# Altium PCB PCB1.PcbDoc
Units mil, origin at the board's own origin, x right, y up, seen from the top; angles counter-clockwise.
Board outline 1970 x 1215 mil, 4 copper layers (Top Layer, Layer 1, Layer 2, Bottom Layer), stack 23.756 mil thick; 61 components, 50 nets, 219 pads, 82 vias.
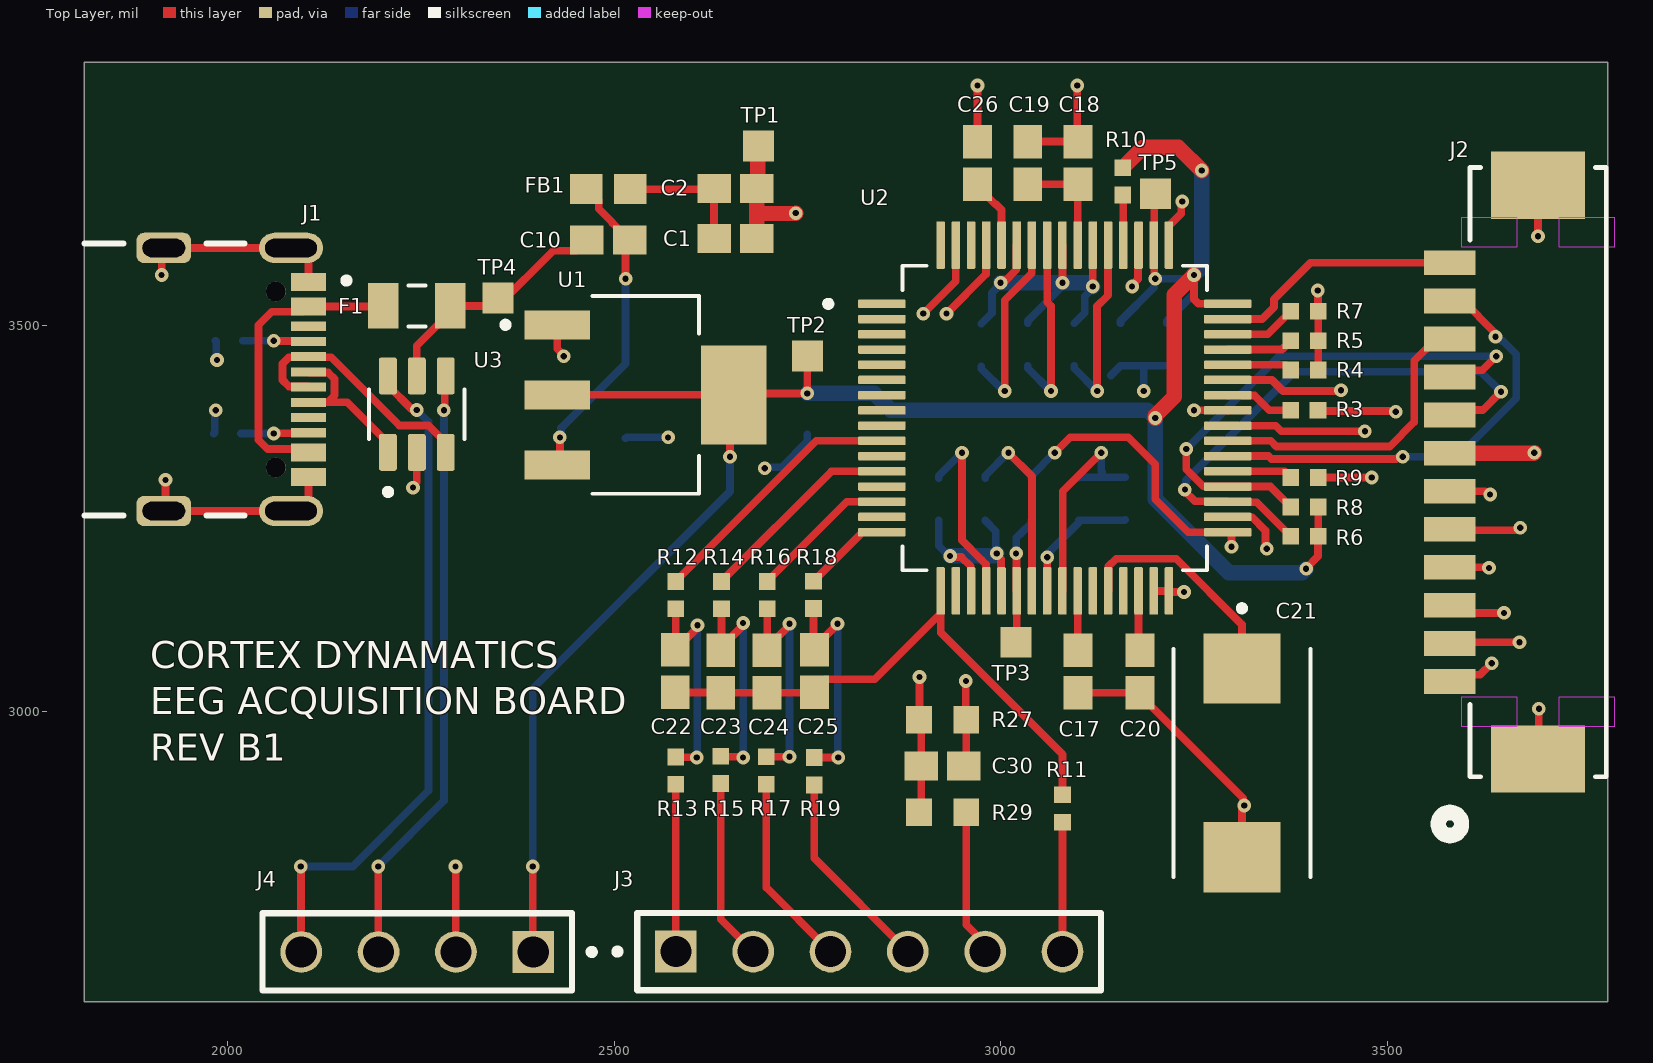
[diagram p0: Top Layer view]
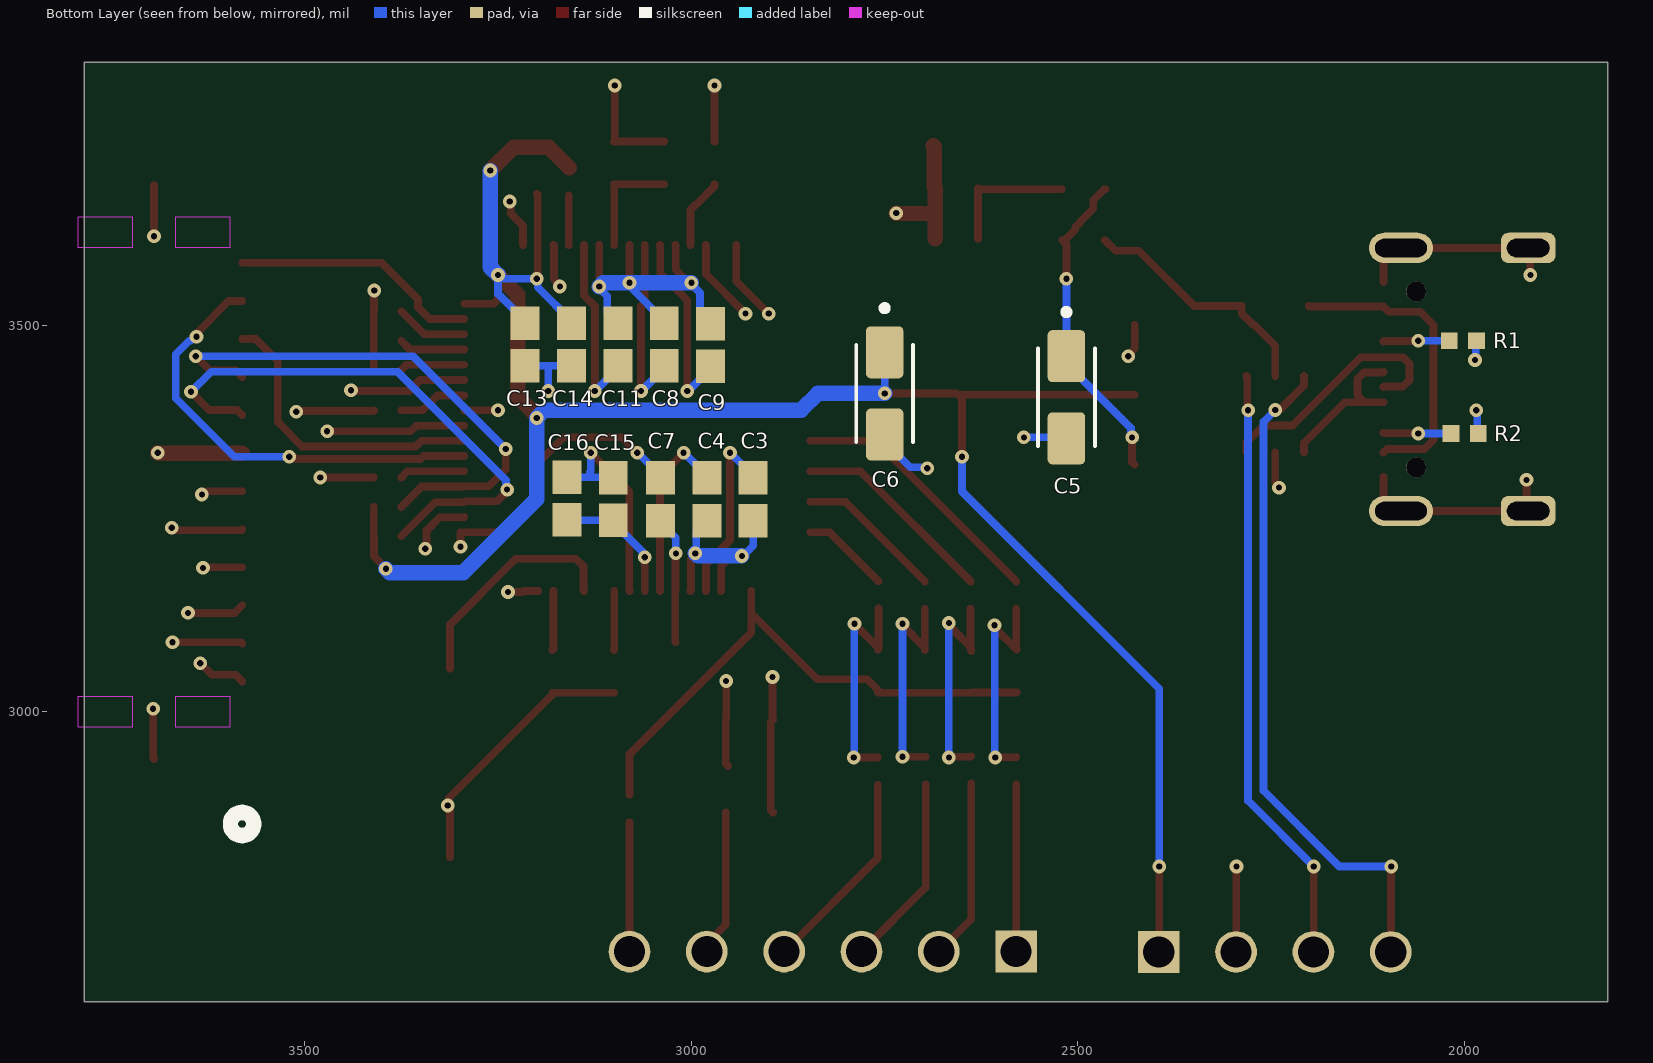
[diagram p1: Bottom Layer view, seen from below]
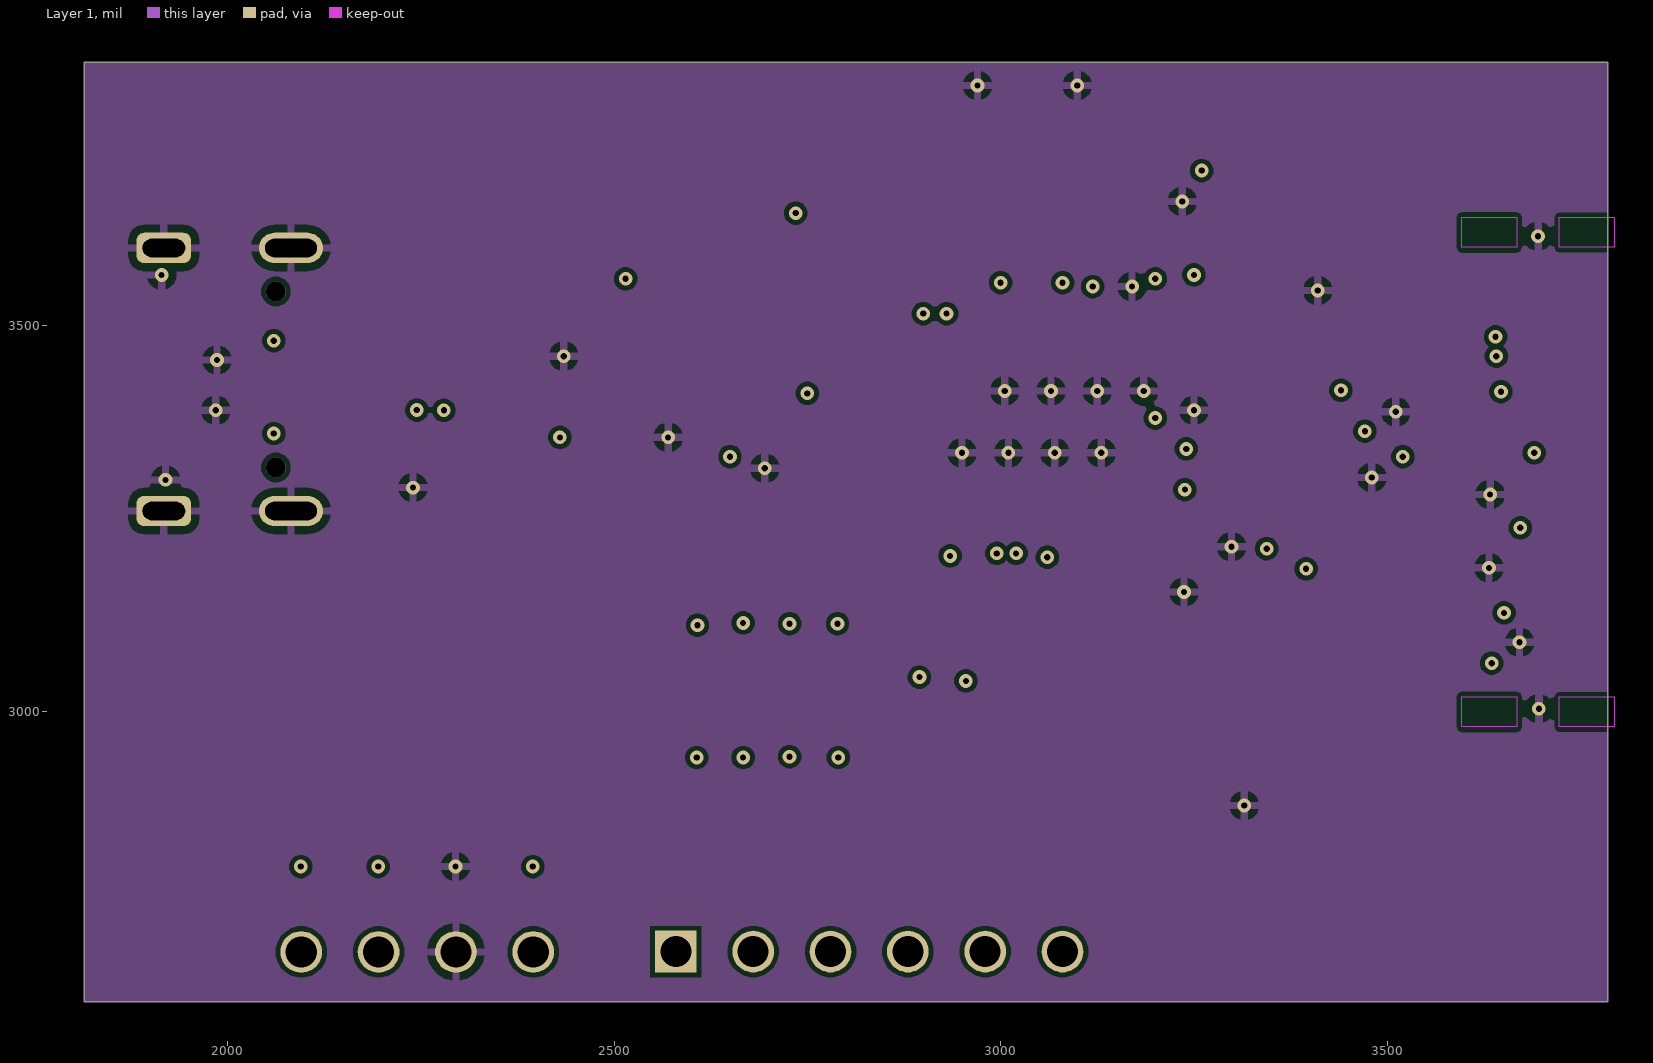
[diagram p2: Layer 1]
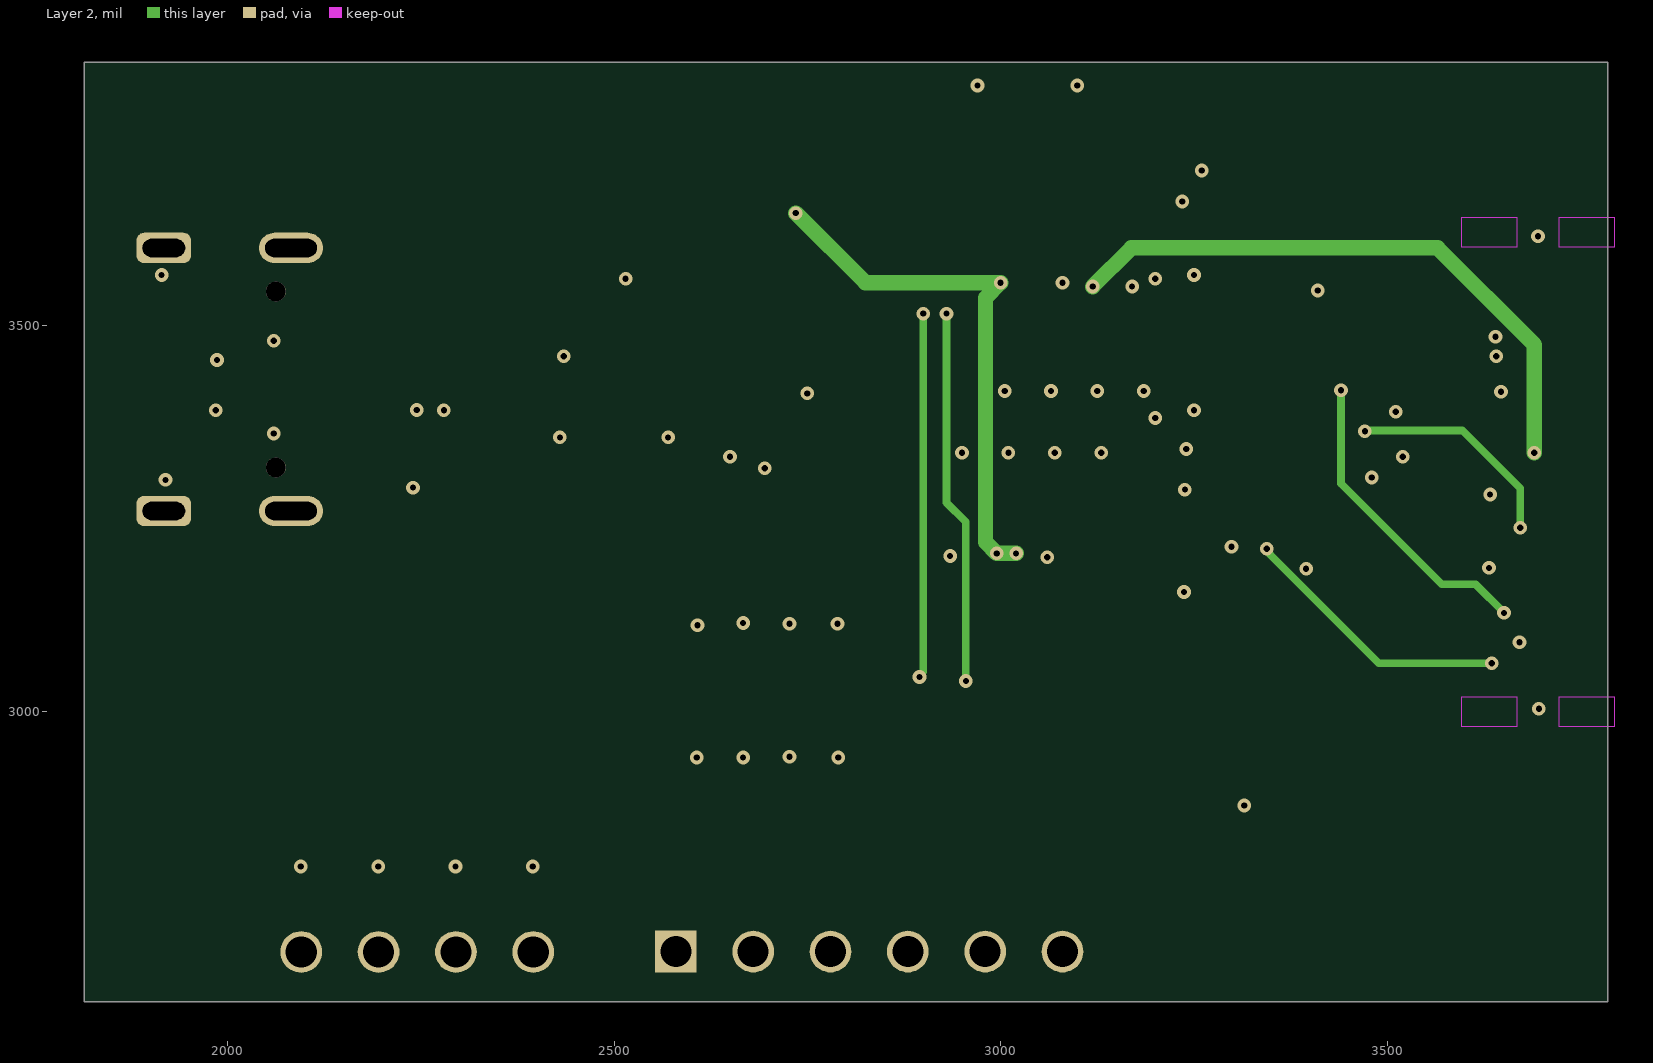
[diagram p3: Layer 2]
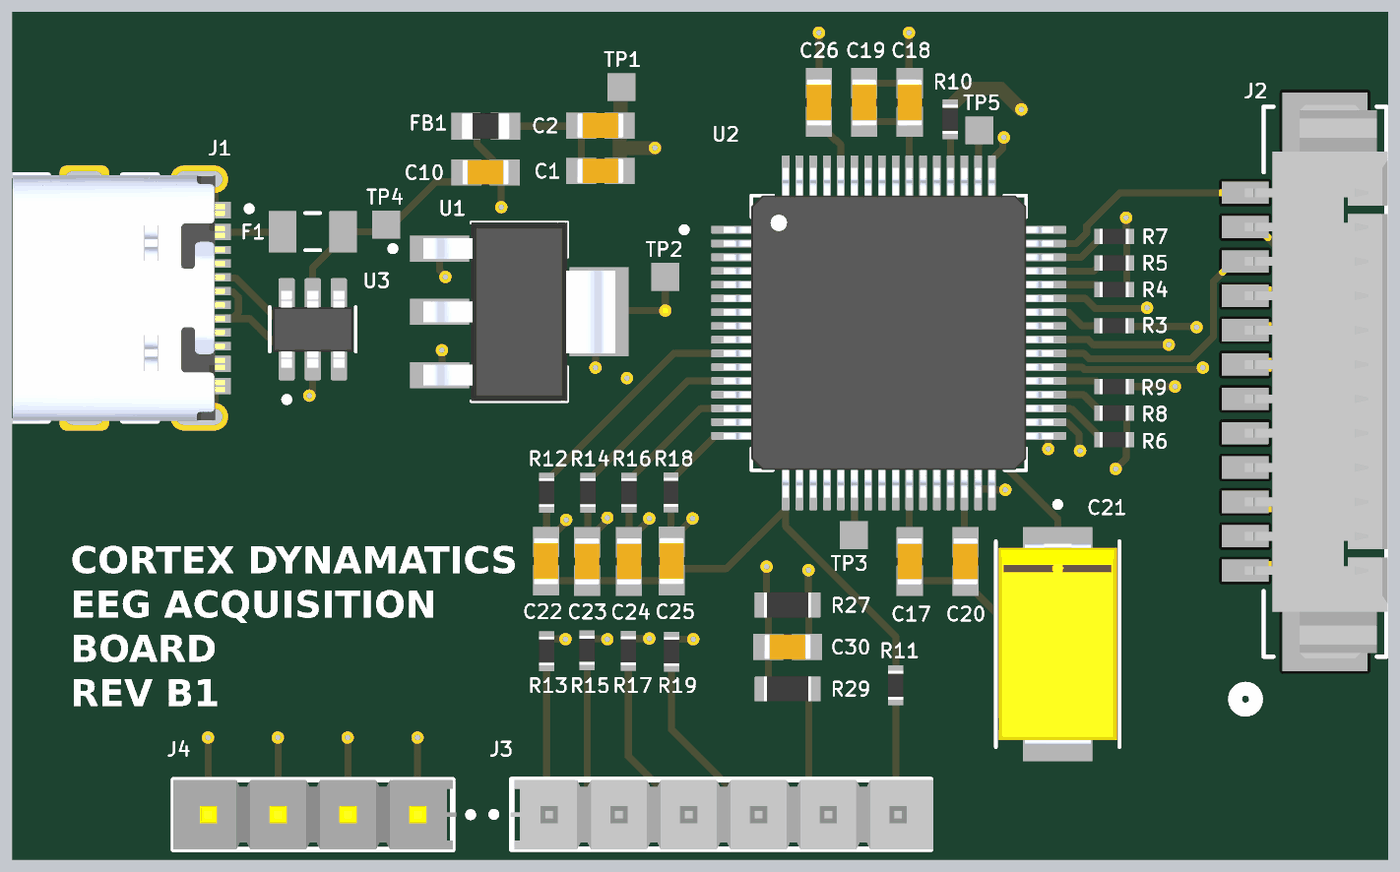
[diagram p4: 3D render of the assembled board from above, using the file's embedded part models]
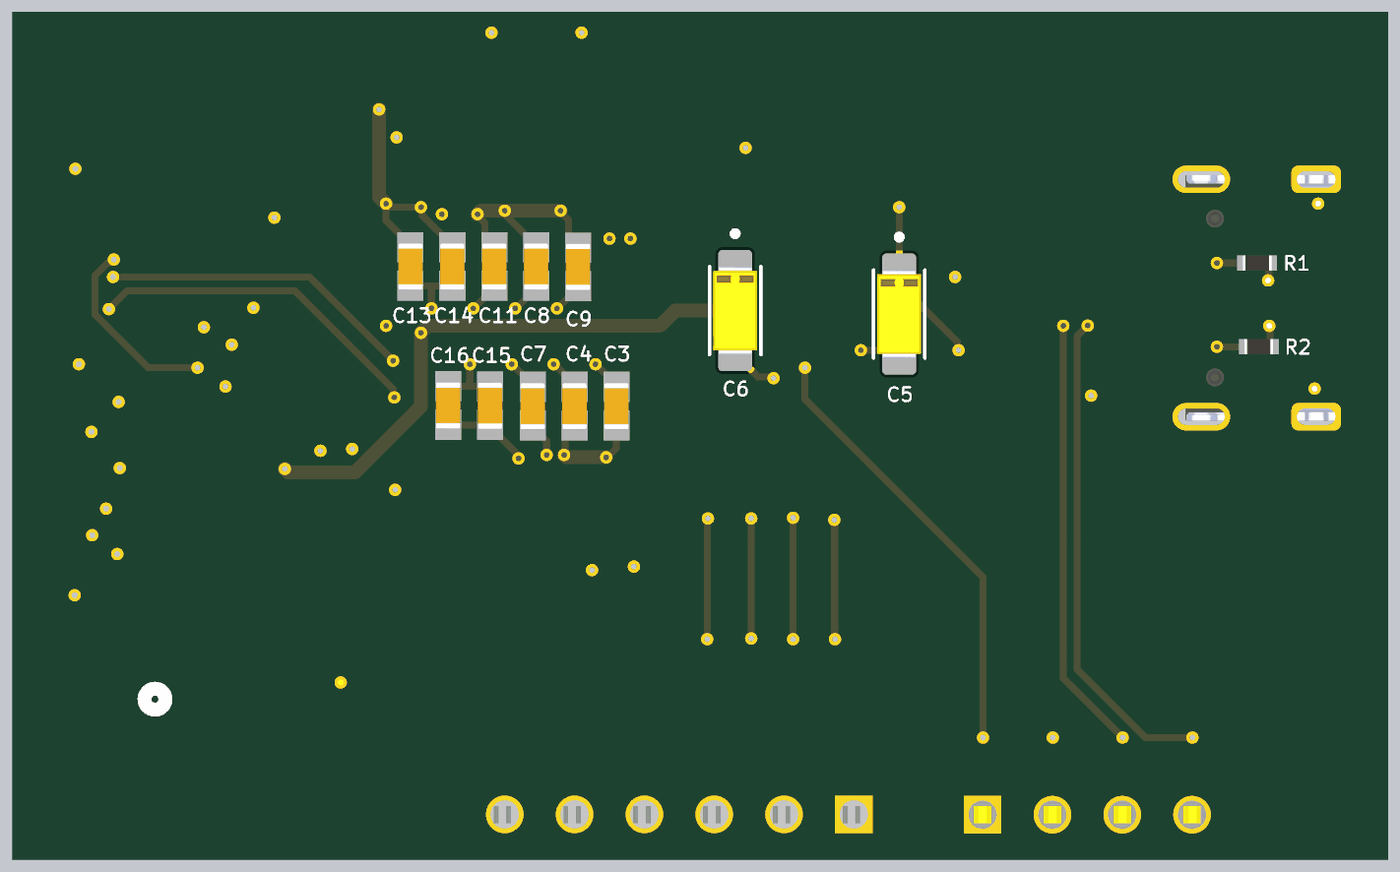
[diagram p5: 3D render of the assembled board from below, using the file's embedded part models]

## Layer stack, top to bottom
Top Solder: solder mask 0.4, Solder Resist, Dk 3.5
Top Layer: signal copper 1.4
Dielectric 2: prepreg 2.8, PP-006, Dk 4.1
Layer 1: signal copper 1.378
Dielectric 1: dielectric 12.6, FR-4, Dk 4.8
Layer 2: signal copper 1.378
Dielectric 3: prepreg 2.8, PP-006, Dk 4.1
Bottom Layer: signal copper 1.4
Bottom Solder: solder mask 0.4, Solder Resist, Dk 3.5

## Board outline
1815,2625 1815,3840 3785,3840 3785,2625

## Design rules (kind name [scope] priority, off if disabled: settings)
Clearance [All] p1: gap=6 ignorepadtopadclearanceinfootprint=FALSE
HoleSize [All] p1: absolutevalues=TRUE maxlimit=248.03 minlimit=8 maxpercent=80.000 minpercent=20.000
MinimumSolderMaskSliver [All] p1: minsoldermaskwidth=4
PlaneClearance [All] p1: clearance=10
PolygonConnect [All] p1: connectstyle=Relief reliefconductorwidth=10 reliefentries=4 polygonreliefangle="90 Angle" airgapwidth=10
RoutingVias [All] p1: holewidth=8 width=17.72 viastyle="Through Hole" minholewidth=8 minwidth=17.72 maxholewidth=28 maxwidth=50
SilkToSilkClearance [All] p1: silktosilkclearance=6
SilkToSolderMaskClearance [IsPad] p1: minsilkscreentomaskgap=6 clearancetoexposedcopper=TRUE
SolderMaskExpansion [All] p1: expansion=0 istentingtop=FALSE
SupplyNets "Schematic Supply Nets_2" [InNet('3V3')] p1: voltage=0.000
SupplyNets "Schematic Supply Nets_1" [InNet('GND')] p2: voltage=0.000
SupplyNets "Schematic Supply Nets" [InNet('5V')] p3: voltage=0.000
UnRoutedNet [All] p1: checkbadconnections=TRUE
Width [All] p1: maxlimit=20 minlimit=6 preferedwidth=10
24 further rules are at their usual default settings.

## Components (designator, comment, footprint, x,y, rotation, side; value= is the part's Value field where it differs from the comment)
C1 "10uF" CAP_0603 2657,3612 r0 top value="10 uF"
C2 "100nF" CAP_0603 2657,3677 r0 top value="100 nF"
C3 "1uF" CAP_0603 2920,3275 r270 bottom value="1 uF"
C4 "1uF" CAP_0603 2980,3275 r270 bottom value="1 uF"
C5 "10uF_T" CAP_TANTALUM_1206 2515,3406.85 r270 bottom value="10 uF"
C6 "10uF_T" CAP_TANTALUM_1206 2750,3411.85 r270 bottom value="10 uF"
C7 "1uF" CAP_0603 3040,3275 r270 bottom value="1 uF"
C8 "1uF" CAP_0603 3035,3475 r90 bottom value="1 uF"
C9 "1uF" CAP_0603 2975,3474.44 r90 bottom value="1 uF"
C10 "10uF" CAP_0603 2492.56,3610 r0 top value="10 uF"
C11 "1uF" CAP_0603 3095,3475 r90 bottom value="1 uF"
C13 "1uF" CAP_0603 3215,3475 r90 bottom value="1 uF"
C14 "1uF" CAP_0603 3155,3475 r90 bottom value="1 uF"
C15 "100nF" CAP_0603 3101,3275.44 r90 bottom value="100 nF"
C16 "10uF" CAP_0603 3161,3276 r90 bottom value="10 uF"
C17 "1uF" CAP_0603 3100,3052.44 r90 top value="1 uF"
C18 "1uF" CAP_0603 3100,3710 r270 top value="1 uF"
C19 "100nF" CAP_0603 3035,3710 r270 top value="100 nF"
C20 "1uF" CAP_0603 3180,3052.44 r90 top value="1 uF"
C21 "100uF_T" CAP_TANTALUM_2917 3312,2938.95 r270 top value="100 uF"
C22 "4.7nF" CAP_0603 2579.19,3052.67 r270 top value="4.7 nF"
C23 "4.7nF" CAP_0603 2638,3052.44 r270 top value="4.7 nF"
C24 "4.7nF" CAP_0603 2698,3052.44 r270 top value="4.7 nF"
C25 "4.7nF" CAP_0603 2759,3053 r270 top value="4.7 nF"
C26 "100nF" CAP_0603 2970,3710 r90 top value="100 nF"
C30 "1.5nF" CAP_0603 2925,2930 r0 top value="1.5 nF"
F1 "MF-PSML110/6-2" MF-PSML110/6-2 2245,3525 r0 top
FB1 "BLM18KG601BH1D" FB_0603 2492.65,3676 r0 top value="600 Ohm"
J1 "USBC_Horizontal" USBC_Horizontal 1962.8,3429.84 r270 top
J2 "53261-1271" 53261-1271 3695,3315 r270 top
J3 "TSW-106-14-L-S" TSW-106-14-L-S 2831,2689.55 r0 top
J4 "TSW-104-14-F-S" TSW-104-14-F-S 2245.56,2689.55 r180 top
R1 "5.1K" RES_0402 2002.28,3480 r180 bottom value="5.1 kOhm"
R2 "5.1K" RES_0402 2000,3360 r180 bottom value="5.1 kOhm"
R3 "10K" RES_0402 3392.72,3390 r0 top value="10 kOhm"
R4 "10K" RES_0402 3393,3442 r0 top value="10 kOhm"
R5 "10K" RES_0402 3393,3480 r0 top value="10 kOhm"
R6 "10K" RES_0402 3393,3227 r180 top value="10 kOhm"
R7 "10K" RES_0402 3393,3518 r0 top value="10 kOhm"
R8 "10K" RES_0402 3393,3265 r180 top value="10 kOhm"
R9 "10K" RES_0402 3393,3303 r180 top value="10 kOhm"
R10 "10K" RES_0402 3158,3686 r270 top value="10 kOhm"
R11 "953R" RES_0402 3080,2875 r270 top value="953 Ohm"
R12 "5.1K" RES_0402 2580,3151 r270 top value="5.1 kOhm"
R13 "953R" RES_0402 2580,2924 r270 top value="953 Ohm"
R14 "5.1K" RES_0402 2639,3151 r270 top value="5.1 kOhm"
R15 "953R" RES_0402 2638,2925 r270 top value="953 Ohm"
R16 "5.1K" RES_0402 2698,3151 r270 top value="5.1 kOhm"
R17 "953R" RES_0402 2697,2924.28 r270 top value="953 Ohm"
R18 "5.1K" RES_0402 2758,3151.28 r270 top value="5.1 kOhm"
R19 "953R" RES_0402 2759,2923.28 r270 top value="953 Ohm"
R27 "1M" RES_0603 2925,2990 r0 top value="1 MOhm"
R29 "100K" RES_0603 2925,2870 r0 top value="100 kOhm"
TP1 "" TestPoint_0.4mm_SMD 2687,3732 r90 top
TP2 "" TestPoint_0.4mm_SMD 2750,3460 r90 top
TP3 "" TestPoint_0.4mm_SMD 3020,3090 r90 top
TP4 "" TestPoint_0.4mm_SMD 2350,3535 r90 top
TP5 "" TestPoint_0.4mm_SMD 3200,3670 r90 top
U1 "LM1117MPX-3.3/NOPB" LM1117MPX-3.3/NOPB 2540.22,3413.82 r0 top
U2 "ADS1299-4PAGR" ADS1299-4PAGR 3065,3380 r0 top
U3 "USBLC6-2SC6" USBLC6-2SC6 2245,3385 r90 top

## Footprints (in the part's own frame and the unit in brackets; to place one, negate y for a bottom-side part, rotate by r counter-clockwise, add the part's x,y. Pads: shape width x height; smd on the part's side, far side on the other; paste and mask are expansions set on the pad)
53261-1271 [mil]
  rect 32x67 smd paste+0 mask+4.02: 1(275.67,-114.35) 2(226.46,-114.35) 3(177.24,-114.35) 4(128.03,-114.35) 5(78.82,-114.35) 6(29.61,-114.35) 7(-19.61,-114.35) 8(-68.82,-114.35) 9(-118.03,-114.35) 10(-167.24,-114.35) 11(-216.46,-114.35) 12(-265.67,-114.35)
  rect 87x122 smd paste+0 mask+4.02: MP1(-366.06,-0.18) MP2(376.06,-0.18)
  Keep-Out Layer region: -285.54,27.32 -324.54,27.31 -324.54,98.31 -285.54,98.31
  Keep-Out Layer region: 334.54,27.32 295.54,27.32 295.54,98.32 334.54,98.32
  Keep-Out Layer region: -285.54,-98.67 -324.54,-98.67 -324.54,-27.67 -285.54,-27.67
  Keep-Out Layer region: 334.54,-98.67 295.54,-98.67 295.54,-27.67 334.54,-27.67
  silkscreen extent -389,-129 475,88, body extent -392,-115 402,90, height 133
ADS1299-4PAGR [mm]
  rrect25% 1.56x0.28 smd: 1(-5.553,3.75) 2(-5.553,3.25) 3(-5.553,2.75) 4(-5.553,2.25) 5(-5.553,1.75) 6(-5.553,1.25) 7(-5.553,0.75) 8(-5.553,0.25) 9(-5.553,-0.25) 10(-5.553,-0.75) 11(-5.553,-1.25) 12(-5.553,-1.75) 13(-5.553,-2.25) 14(-5.553,-2.75) 15(-5.553,-3.25) 16(-5.553,-3.75) 33(5.807,-3.75) 34(5.807,-3.25) 35(5.807,-2.75) 36(5.807,-2.25) 37(5.807,-1.75) 38(5.807,-1.25) 39(5.807,-0.75) 40(5.807,-0.25) 41(5.807,0.25) 42(5.807,0.75) 43(5.807,1.25) 44(5.807,1.75) 45(5.807,2.25) 46(5.807,2.75) 47(5.807,3.25) 48(5.807,3.75)
  rrect25% 0.28x1.56 smd: 17(-3.623,-5.68) 18(-3.123,-5.68) 19(-2.623,-5.68) 20(-2.123,-5.68) 21(-1.623,-5.68) 22(-1.123,-5.68) 23(-0.623,-5.68) 24(-0.123,-5.68) 25(0.377,-5.68) 26(0.877,-5.68) 27(1.377,-5.68) 28(1.877,-5.68) 29(2.377,-5.68) 30(2.877,-5.68) 31(3.377,-5.68) 32(3.877,-5.68) 49(3.877,5.68) 50(3.377,5.68) 51(2.877,5.68) 52(2.377,5.68) 53(1.877,5.68) 54(1.377,5.68) 55(0.877,5.68) 56(0.377,5.68) 57(-0.123,5.68) 58(-0.623,5.68) 59(-1.123,5.68) 60(-1.623,5.68) 61(-2.123,5.68) 62(-2.623,5.68) 63(-3.123,5.68) 64(-3.623,5.68)
  silkscreen extent -7.41,-5 5.13,5, body extent -5.87,-6 6.13,6, height 1.2
CAP_0603 [mm]
  rect 1.1x0.95 smd: 1(-0.7,0) 2(0.7,0)
  body extent -0.85,-0.45 0.85,0.45, height 0.9
CAP_TANTALUM_1206 [mm]
  rrect25% 1.71x1.23 smd paste+0 mask+0.102: 1(-1.35,0) 2(1.35,0)
  silkscreen extent -2.9,-0.93 1.6,0.93, body extent -1.6,-0.8 1.6,0.8, height 1.8
CAP_TANTALUM_2917 [mm]
  rect 2.31x2.52 smd: 1(-2.973,0) 2(3.227,0)
  silkscreen extent -5.05,-2.25 3.88,2.25, body extent -3.52,-2.15 3.78,2.15, height 3.1
FB_0603 [mm]
  rect 1.07x0.98 smd: 1(-0.72,0) 2(0.72,0)
  body extent -0.87,-0.48 0.87,0.48, height 0.95
LM1117MPX-3.3/NOPB [mm]
  rect 2.15x0.95 smd: 1(-2.885,2.203) 2(-2.885,-0.097) 3(-2.885,-2.397)
  rect 2.15x3.25 smd: 4(2.915,-0.097)
  silkscreen extent -4.68,-3.35 1.77,3.15, body extent -3.48,-3.35 3.51,3.15, height 1.8
MF-PSML110/6-2 [mm]
  rect 1x1.5 smd: 1(-1.1,0) 2(1.1,0)
  silkscreen extent -0.28,-0.67 0.28,0.67
RES_0402 [mm]
  rect 0.55x0.55 smd: 1(-0.45,0) 2(0.45,0)
  body extent -0.53,-0.28 0.53,0.28, height 0.4
RES_0603 [mm] "Chip Resistor, 2-Leads, Body 1.60x0.80mm, IPC Medium Density"
  rect 0.85x0.9 smd: 1(-0.775,0) 2(0.775,0)
  body extent -0.85,-0.45 0.85,0.45, height 0.55
TestPoint_0.4mm_SMD [mil]
  rect 40x40 smd: 1(0,0)
TSW-104-14-F-S [mm]
  rect 1.37x1.37 / inner round 1.37 / far side rect 1.37x1.37 hole 1.02: 1(-3.81,0)
  round 1.37 hole 1.02: 2(-1.27,0) 3(1.27,0) 4(3.81,0)
  silkscreen extent -5.83,-1.27 5.08,1.27, body extent -5.21,-1.27 5.08,1.27, height 10.67
TSW-106-14-L-S [mm]
  rect 1.37x1.37 hole 1.02: 1(-6.376,0.011)
  round 1.37 hole 1.02: 2(-3.836,0.011) 3(-1.296,0.011) 4(1.244,0.011) 5(3.784,0.011) 6(6.324,0.011)
  silkscreen extent -8.4,-1.26 7.59,1.28, body extent -7.68,-1.27 7.68,1.27, height 10.67
USBC_Horizontal [mm]
  rect 0.6x1.15 smd: A1_B12(-3.2,3.612) A4_B9(-2.4,3.612) B1_A12(3.2,3.612) B4_A9(2.4,3.612)
  rect 0.3x1.15 smd: A5(-1.25,3.612) A6(-0.25,3.612) A7(0.25,3.612) A8(1.25,3.612) B5(1.75,3.612) B6(0.75,3.612) B7(-0.75,3.612) B8(-1.75,3.612)
  oval 1x2.1 hole 0.6 slot 1.7 at 90 deg: SH1(-4.32,3.037) SH2(4.32,3.037)
  rrect50% 1x1.8 hole 0.6 slot 1.4 at 90 deg: SH3(-4.32,-1.143) SH4(4.32,-1.143)
  round 0.65 hole 0.65 unplated: ""(-2.89,2.537) ""(2.89,2.537)
  silkscreen extent -4.47,-3.74 4.47,4.96, body extent -4.47,-3.74 4.47,3.97, height 3.31
USBLC6-2SC6 [mm]
  rrect25% 1.21x0.59 smd: 1(-1.255,0.95) 2(-1.255,0) 3(-1.255,-0.95) 4(1.255,-0.95) 5(1.255,0) 6(1.255,0.95)
  silkscreen extent -2.65,-1.57 0.81,1.57, body extent -1.4,-1.46 1.4,1.46, height 1.35

## Part data
C1 C10 C16: library part C_10u_0805, "10 uF 10% 0805 X7R MLCC", Dielectric=X7R, Manufacturer=Yageo, Manufacturer Part Number=C0805C106K8RACTU, Package (Imperial)=0805, Supplier Part Number 1=80-C0805C106K8R, Tolerance=10%, Voltage Rating DC="10 VDC", Datasheet=https://yageogroup.com/component-documentation/download/datasheet/C0805C106K8RACTU?lang=en, Supplier 1=Mouser, Supplier 2=DigiKey, Supplier Part Number 2=399-C0805C106K8RACTUCT-ND
C2 C15 C19 C26: library part C_100n_0603, "100 nF 1% 0603 X7R MLCC", Dielectric=X7R, Manufacturer=Yageo, Manufacturer Part Number=CC0603KRX7R9BB104, Package (Imperial)=0603, Supplier Part Number 1=603-CC603KRX7R9BB104, Tolerance=1%, Voltage Rating DC="50 VDC", Datasheet=https://yageogroup.com/component-documentation/download/datasheet/CC0603KRX7R9BB104?lang=en, Supplier 1=Mouser, Supplier 2=DigiKey, Supplier Part Number 2=311-1344-6-ND
C3 C4 C7 C8 C9 C11 C13 C14 C17 C18 C20: library part C_1u_0603, "1 uF 10% 0603 X7R MLCC", Dielectric=X7R, Manufacturer=Yageo, Manufacturer Part Number=CC0603KRX7R7BB105, Package (Imperial)=0603, Supplier Part Number 1=603-CC603KRX7R7BB105, Tolerance=10%, Voltage Rating DC="16 VDC", Datasheet=https://yageogroup.com/component-documentation/download/datasheet/CC0603KRX7R7BB105?lang=en, Supplier 1=Mouser, Supplier 2=DigiKey, Supplier Part Number 2=311-1446-1-ND
C5 C6: library part C_10u_1206_TANTALUM, "10 uF 10% 1206 Tantalum Capacitor", Dielectric=Tantalum, Manufacturer="Yageo (KEMET)", Manufacturer Part Number=T491A106K006AT, Package (Imperial)=1206, Supplier Part Number 1=80-T491A106K006, Tolerance=10%, Voltage Rating DC="6.3 VDC", ComponentLink1Description=Datasheet, ComponentLink1URL=https://yageogroup.com/component-documentation/download/datasheet/T491A106K006AT?lang=en, Supplier 1=Mouser
C21: library part C_100u_2817_TANTALUM, "100 uF 10% 2817 Tantalum capacitor", Dielectric=Tantalum, Manufacturer="Yageo (KEMET)", Manufacturer Part Number=T495D107K016ATE100, Package (Imperial)=2817, Tolerance=10%, Voltage Rating DC="16 VDC", Datasheet=https://yageogroup.com/component-documentation/download/datasheet/T495D107K016ATE100?lang=en
C22 C23 C24 C25: library part C_4.7n_0603, "4.7 nF 1% 0603 X7R MLCC", Dielectric=X7R, Manufacturer=Yageo, Manufacturer Part Number=CC0603KRX7R9BB472, Package (Imperial)=0603, Supplier Part Number 1=603-C0603KRX7R9BB472, Tolerance=10%, Voltage Rating DC="50 VDC", Datasheet=https://yageogroup.com/component-documentation/download/datasheet/CC0603KRX7R9BB472?lang=en, Supplier 1=Mouser, Supplier 2=Newark, Supplier 3=DigiKey, Supplier Part Number 2=CC0603KRX7R9BB472, Supplier Part Number 3=311-1083-6-ND
C30: library part C_1.5n_0603, "1.5 nF 1% 0603 C0G MLCC", Dielectric=C0G, Manufacturer=Yageo, Manufacturer Part Number=CC0603FRNPO9BN152, Package (Imperial)=0603, Tolerance=1%, Voltage Rating DC="50 VDC", Datasheet=https://yageogroup.com/component-documentation/download/datasheet/CC0603FRNPO9BN152?lang=en
F1: "PPTC 6V 1.1A", Hold Current="1.1 A", Manufacturer=Bourns, Maximum Current="50 A", Maximum Voltage="6 VDC", Package (Imperial)=0805, Supplier Part Number 1=652-MF-PSML110/6-2, Trip Current="2.2 A", Manufacturer Part Number=MF-PSML110/6-2, Supplier 1=Mouser, Supplier 2=Newark, Supplier 3=DigiKey, Supplier Part Number 2=MF-PSML110/6-2, Supplier Part Number 3=118-MF-PSML110/6-2CT-ND
FB1: "FB 600 Ohm 1 A", Manufacturer=Murata, Maximum DC Current="1 A", Package (Imperial)=0603, Supplier Part Number 1=81-BLM18KG601BH1D, Tolerance=25%, Manufacturer Part Number=BLM18KG601BH1D, Supplier 1=Mouser, Supplier 2=DigiKey, Supplier Part Number 2=490-14032-1-ND
J1: "USB-C, USB-2.0 SMD 16 contacts, horizontal", Current Rating="5 A", Manufacturer=GCT, Manufacturer Part Number=USB4105GFA, Supplier Part Number 1=640-USB4105-GF-A, Voltage Rating="48 VDC", Number of Contacts=16, Standard=USB-2.0, Supplier 1=Mouser, Supplier 2=DigiKey, Supplier Part Number 2=2073-USB4105-GF-ADKR-ND, Termination=SMD
J2: "1x12 Headers 2.54 Pitch", Manufacturer=Molex, Supplier Part Number 1=538-53261-1271, Manufacturer Part Number=53261-1271, Number of Positions=12, Number of Rows=1, Pitch="2.54 mm", Supplier 1=Mouser, Supplier 2=DigiKey, Supplier Part Number 2=WM7630DKR-ND
J3: "1x6 Headers 2.54 Pitch", Manufacturer=Samtec, Supplier Part Number 1=200-TSW10614LS, Manufacturer Part Number=TSW-106-14-L-S, Number of Positions=6, Number of Rows=1, Supplier 1=Mouser, Supplier 2=DigiKey, Supplier Part Number 2=612-TSW-106-14-L-S-ND
J4: "1x4 Headers 2.54 Pitch", Manufacturer=Samtec, Supplier Part Number 1=200-TSW10414FS, Manufacturer Part Number=TSW-104-14-F-S, Number of Positions=4, Number of Rows=1, Pitch="2.54 mm", Supplier 1=Mouser, Supplier 2=DigiKey, Supplier Part Number 2=SAM15369-ND
R1 R2 R12 R14 R16 R18: library part R_5.1K_0402, "5.1 kOhm 1% 0402 resistor", Manufacturer=Yageo, Manufacturer Part Number=RC0402FR-075K1L, Package (Imperial)=0402, Power Rating="0.063 W", Supplier Part Number 1=603-RC0402FR-075K1L, Tolerance=1%, Voltage Rating="50 V", ComponentLink1Description=Datasheet, ComponentLink1URL=https://yageogroup.com/component-documentation/download/datasheet/RC0402FR-071K5L?lang=en, Supplier 1=Mouser, Supplier 2=Newark, Supplier 3=DigiKey, Supplier Part Number 2=RC0402FR-075K1L, Supplier Part Number 3=311-5.10KLRDKR-ND
R3 R4 R5 R6 R7 R8 R9 R10: library part R_10K_0402, "10 kOhm 1% 0402 resistor", Manufacturer=Yageo, Manufacturer Part Number=RC0402FR-0710KL, Package (Imperial)=0402, Power Rating="0.063 W", Supplier Part Number 1=603-RC0402FR-0710KL, Tolerance=1%, Voltage Rating="50 V", ComponentLink1Description=Datasheet, ComponentLink1URL=https://yageogroup.com/component-documentation/download/datasheet/RC0402FR-071K5L?lang=en, Supplier 1=Mouser, Supplier 2=Newark, Supplier 3=DigiKey, Supplier Part Number 2=RC0402FR-0710KL., Supplier Part Number 3=311-10.0KLRDKR-ND
R11 R13 R15 R17 R19: library part R_953R_0402, "953 Ohm 1% 0402 resistor", Manufacturer=Yageo, Manufacturer Part Number=RC0402FR-07953RL, Package (Imperial)=0402, Power Rating="0.063 W", Supplier Part Number 1=603-RC0402FR-07953RL, Tolerance=1%, Voltage Rating="50 V", ComponentLink1Description=Datasheet, ComponentLink1URL=https://yageogroup.com/component-documentation/download/datasheet/RC0402FR-071K5L?lang=en, Supplier 1=Mouser, Supplier 2=Newark, Supplier 3=DigiKey, Supplier Part Number 2=RC0402FR-07953RL, Supplier Part Number 3=YAG3263DKR-ND
R27: library part R_1M_0603, "1 MOhm 1% 0603 resistor", Manufacturer=Yageo, Manufacturer Part Number=RC0603FR-071ML, Package (Imperial)=0603, Power Rating="0.1 W", Supplier Part Number 1=603-RC0603FR-071ML, Tolerance=1%, Voltage Rating="75 V", ComponentLink1Description=Datasheet, ComponentLink1URL=https://yageogroup.com/component-documentation/download/datasheet/RC0603FR-071ML?lang=en, Supplier 1=Mouser, Supplier 2=DigiKey, Supplier Part Number 2=311-1.00MHRDKR-ND
R29: library part R_100K_0603, "100 kOhm 1% 0603 resistor", Manufacturer=Yageo, Manufacturer Part Number=RC0603FR-07100KL, Package (Imperial)=0603, Power Rating="0.1 W", Tolerance=1%, Voltage Rating="75 V", ComponentLink1Description=Datasheet, ComponentLink1URL=https://yageogroup.com/component-documentation/download/datasheet/RC0603FR-07100KL?lang=en
TP1 TP2 TP3 TP4 TP5: library part TestPoint_0.4mm, "SMD Testpoint. No component to be bought."
U1: "Adjustable voltage regulator, 800mA, PMIC", Input Voltage="4.5V - 18V", Manufacturer="Texas Instruments", Output Current=800mA, Output Voltage="3.3V Fixed", Package=SOT-223-4, Supplier Part Number 1=926-LM1117MPX3.3NOPB, ComponentLink1Description=Datasheet, ComponentLink1URL=https://www.ti.com/lit/gpn/lm1117, Manufacturer Part Number=LM1117MPX-3.3/NOPB, Supplier 1=Mouser, Supplier 2="Texas Instruments", Supplier 3=DigiKey, Supplier 4=Newark, Supplier Part Number 2=LM1117MPX-3.3/NOPB, Supplier Part Number 3=LM1117MPX-3.3/NOPBCT-ND, Supplier Part Number 4=LM1117MPX-3.3/NOPB, Topology=LDO
U2: "24-bit low-noise ADC, 4-channel EEG AFE", Input Voltage=1.8-5V, Manufacturer="Texas Instruments", Output Current=-, Package=TQFP-64, Supplier Part Number 1=595-ADS1299-4PAGR, ComponentLink1Description=Datasheet, ComponentLink1URL=https://www.ti.com/lit/gpn/ads1299-4, Manufacturer Part Number=ADS1299-4PAGR, Output Voltage=-, Supplier 1=Mouser, Supplier 2="Texas Instruments", Supplier 3=DigiKey, Supplier Part Number 2=ADS1299-4PAGR, Supplier Part Number 3=296-45228-6-ND, Topology=-
U3: "Dual-line ESD Surge Protector, 0.6 pF", Input Voltage=-, Manufacturer=STMicroelectronics, Package=SOT-23-6, Supplier Part Number 1=511-USBLC6-2SC6, Manufacturer Part Number=USBLC6-2SC6, Output Current=-, Output Voltage=-, Supplier 1=Mouser, Supplier 2=DigiKey, Supplier Part Number 2=497-5235-6-ND, Topology=-

## Via types
v1: diameter 17.72, hole 8, Top Layer to Bottom Layer, 82 vias

## Nets (pads, with @x,y where several pads share a name; then routed paths per layer and width w, separated by ;. In a path a pad name is that pad's centre, name@x,y a point inside that pad or via, vN(x,y) a via of type N, cw(c..) or ccw(c..) an arc to the next point about the centre after c; other vN are vias at no path point)
3V3: C6.1 C13.2 C14.2 J4.1 R6.1 R8.1 R10.1 TP2.1 TP5.1 U1.2 U1.4 U2.48 U2.50 | length 3009
  Top Layer w10: v1(2395,2800) 2395,2690.11 J4.1 ; U1.2 U1.4 ; v1(2650,3330) 2650,3405 U1.4 ; TP2.1 v1(2750,3411.85) 2656.85,3411.85 U1.4 ; v1(3200,3560) 3200,3562.09 3198.46,3563.62 3198.46,3668.46 TP5.1 ; v1(3250,3565) 3250,3533.5 3255.86,3527.64 U2.48 ; v1(3395,3185) 3395,3185.81 3410.36,3201.17 3410.36,3226.64 R6.1 R8.1
  Top Layer w20: R10.1 3184.28,3730 3230,3730 v1(3260,3700) ; v1(3200,3380) 3200,3383.22 3224.23,3407.46 3224.23,3539.23 v1(3250,3565)
  Bottom Layer w10: v1(2395,2800) 2395,3030 2650,3285 v1(2650,3330) ; v1(2750,3411.85) C6.1 ; C14.2 3155,3505.51 3198.52,3549.04 3198.52,3558.52 v1(3200,3560) 3242.91,3560 3247.91,3565 v1(3250,3565) 3250,3540.51 3215,3505.51 C13.2
  Bottom Layer w20: v1(2750,3411.85) 2836.3,3411.85 2858.01,3390.14 3189.86,3390.14 v1(3200,3380) 3200,3275 3295,3180 3390,3180 v1(3395,3185) ; v1(3250,3565) 3260,3575 v1(3260,3700)
5V: C1.2 C2.2 C3.2 C4.2 C7.2 C8.2 C9.2 C11.2 J2.7 TP1.1 TP3.1 U2.19 U2.21 U2.22 U2.54 U2.56 U2.59 | length 2675.6
  Top Layer w10: v1(2934.67,3201.62) 2936.15,3200.14 2949.25,3200.14 2961.22,3188.17 2961.22,3156.89 U2.19 ; v1(2995,3205) 2995,3202.91 3000.59,3197.32 3000.59,3156.89 U2.21 ; v1(3000,3555) 3001.48,3556.48 3004.93,3556.48 3020.28,3571.83 3020.28,3603.11 U2.59 ; TP3.1 3020.79,3090.79 U2.22 3020.39,3156.77 3020.39,3204.61 v1(3020,3205) ; U2.56 3079.93,3603.54 3079.93,3555.09 v1(3080.02,3555) ; v1(3119.04,3550) 3119.13,3550.09 3119.13,3603.54 U2.54
  Top Layer w20: C1.2 2684.56,3644.5 ; TP1.1 2685.78,3730.78 2685.78,3678.22 C2.2 2684.56,3644.5 ; v1(2735,3645) 2734.5,3644.5 2684.56,3644.5 ; J2.7 3689.61,3334.61 v1(3690,3335)
  Layer 2 w20: v1(2735,3645) 2825,3555 v1(3000,3555) 2980.38,3535.38 2980.38,3219.62 v1(2995,3205) v1(3020,3205) ; v1(3119.04,3550) 3169.04,3600 3565,3600 3690,3475 v1(3690,3335)
  Bottom Layer w10: C3.2 2920,3215 2933.38,3201.62 v1(2934.67,3201.62) ; C9.2 2988.7,3515.7 2988.7,3541.61 3000,3552.91 v1(3000,3555) ; C4.2 2993.7,3233.74 2993.7,3206.3 v1(2995,3205) ; v1(3020,3205) 3020,3224.93 3025.86,3230.79 3026.3,3230.79 3040,3244.49 C7.2 ; C8.2 3035,3505.51 3078.54,3549.05 3078.54,3553.52 v1(3080.02,3555) ; C11.2 3108.7,3516.26 3108.7,3537.57 3119.04,3547.91 v1(3119.04,3550)
  Bottom Layer w20: v1(2934.67,3201.62) 2991.62,3201.62 v1(2995,3205) ; v1(3000,3555) v1(3080.02,3555) 3114.04,3555 v1(3119.04,3550)
BIASINV: C30.2 R27.2 U2.61 | length 706.7
  Top Layer w10: v1(2930,3515) 2980.91,3565.91 2980.91,3603.11 U2.61 ; C30.2 2955.51,2932.95 R27.2 2955,2990.51 v1(2955,3040)
  Layer 2 w10: v1(2930,3515) 2930,3270.66 2955,3245.66 v1(2955,3040)
BIASOUT: C30.1 R27.1 R29.1 U2.63 | length 755.8
  Top Layer w10: R29.1 2897.44,2872.95 C30.1 2897.44,2987.05 R27.1 2895,2990.51 v1(2895,3045) ; v1(2900,3515) 2942.05,3557.05 U2.63
  Layer 2 w10: v1(2895,3045) 2895,3047.09 2900,3052.09 v1(2900,3515)
GND: C3.1 C4.1 C5.2 C6.2 C7.1 C8.1 C9.1 C11.1 C13.1 C14.1 C15.2 C16.2 C17.1 C18.1 C19.1 C20.1 C21.2 C26.2 J1.A1_B12 J1.B1_A12 J1.SH1 J1.SH2 J1.SH3 J1.SH4 J2.2 J2.4 J2.6 J2.MP1 J2.MP2 J4.2 R1.2 R2.2 R3.2 R4.2 R5.2 R7.2 R9.1 U1.1 U2.20 U2.23 U2.25 U2.31 U2.32 U2.33 U2.41 U2.49 U2.51 U2.53 U2.57 U2.58 U3.2 | length 4246.2
  Top Layer w10: v1(1915,3565) 1915,3597.13 J1.SH3 J1.SH1 2091.43,3599.92 2105,3586.35 J1.A1_B12 ; v1(1920,3300) 1920,3261.97 J1.SH4 J1.SH2 ; J1.SH2@2091.43,3259.76 2105,3273.33 J1.B1_A12 ; v1(2240.14,3290) 2240.14,3292.09 2245,3296.95 U3.2 ; v1(2295,2800) 2295.28,2799.72 2295.28,2689.83 J4.2 ; U1.1 2426.65,3469.42 2435,3461.08 v1(2435,3460) ; v1(2950,3335) 2950,3222.02 2975.14,3196.88 2975.14,3196.77 2980.91,3191.01 2980.91,3156.89 U2.20 ; C26.2 v1(2970,3810) ; v1(3005.24,3415) 3005.24,3532.15 3040.28,3567.19 3040.28,3603.43 U2.58 ; v1(3010,3335) 3040.47,3304.53 U2.23 ; C19.1 C18.1 3099,3738.56 v1(3099,3810) ; U2.57 3060.16,3529.84 3065,3525 v1(3065,3415) ; v1(3070,3335) 3090,3355 3165,3355 3200,3320 3200,3275 3242.64,3232.36 U2.33 ; U2.25 3080.19,3156.72 3080.19,3285.19 v1(3130,3335) ; C17.1 C20.1 3180,3021.93 3313.52,2888.41 3313.52,2880.48 v1(3315,2879) 3315,2876.91 3312,2873.91 C21.2 ; v1(3125,3415) 3124.54,3415.46 3124.54,3524.54 3138.9,3538.9 U2.53 ; v1(3170,3550) 3170,3552.09 3177.76,3559.84 3177.76,3603.11 U2.51 ; U2.31 U2.32 3217.64,3155.51 3218.15,3155 v1(3237,3155) ; U2.49 3217.64,3628.82 3233.38,3644.56 3233.38,3658.52 v1(3234.86,3660) ; v1(3250,3390.02) 3250.09,3389.93 3293.54,3389.93 U2.41 ; v1(3298.54,3213.54) U2.33@3298.54,3231.85 ; v1(3410,3545) 3410.36,3544.64 3410.36,3518.36 R7.2 R5.2 R4.2 ; R3.2 3411.43,3389 3510,3389 v1(3511,3388) ; R9.1 v1(3480,3303) ; J2.2 3582.11,3090 v1(3671,3090) ; J2.4 3630.69,3186.97 v1(3631.42,3186.24) ; J2.6 3626.52,3285.39 3630.91,3281 v1(3633,3281) ; J2.MP2 3696,2940.11 v1(3696,3004) ; J2.MP1 3695,3680.89 v1(3695,3615)
  Bottom Layer w10: R2.2 1983.64,3361.36 1983.64,3388.64 v1(1985,3390) ; R1.2 1985.61,3478.95 1985.61,3456.05 v1(1986.66,3455) ; C5.2 2516.3,3355 v1(2570,3355) ; v1(2695,3315) 2696.48,3316.48 2716.68,3316.48 2750,3349.79 C6.2 ; C3.1 2920,3305.51 2949.49,3335 v1(2950,3335) ; C9.1 2975,3443.93 3003.93,3415 v1(3005.24,3415) ; C4.1 2980,3305.51 3009.49,3335 v1(3010,3335) ; C8.1 3035,3444.49 3064.49,3415 v1(3065,3415) ; C7.1 3040,3305.51 3069.49,3335 v1(3070,3335) ; C11.1 3095,3444.49 3124.49,3415 v1(3125,3415) ; C15.2 3101.56,3303.56 3131.28,3303.56 ; v1(3130,3335) 3130,3311.14 3131.28,3309.86 3131.28,3303.56 ; C14.1@3142.56,3435 C14.1 3185,3447.44 ; C16.2 3131.28,3303.56 ; v1(3185,3415) 3185,3447.44 ; C13.1 3185,3447.44
NetC1_1: C1.1 C2.1 FB1.2 | length 173.9
  Top Layer w10: FB1.2 2628.44,3676 C2.1 C1.1
NetC5_1: C5.1 C10.2 FB1.1 U1.3 | length 421.2
  Top Layer w10: U1.3 2430,3322.8 v1(2430,3355) ; FB1.1 2466.08,3676 2480.37,3661.71 2480.37,3650.54 2497.65,3633.26 2497.65,3632.35 2503.46,3626.54 2503.46,3623.7 2517.17,3610 C10.2 2515,3604.88 v1(2515,3560)
  Bottom Layer w10: v1(2430,3355) 2431.48,3356.48 2431.48,3367.03 2515,3450.55 v1(2515,3560)
NetC10_1: C10.1 F1.2 TP4.1 U3.5 | length 321.2
  Top Layer w10: U3.5 2245,3473.23 2272.24,3500.47 2273.62,3500.47 2288.31,3515.16 F1.2 2350,3525 2421.3,3596.3 2451.3,3596.3 C10.1
NetC15_1: C15.1 C16.1 U2.24 | length 168.7
  Top Layer w10: U2.24 3060.24,3156.46 3060.24,3199.91 v1(3060.33,3200)
  Bottom Layer w10: v1(3060.33,3200) 3061.81,3201.48 3061.81,3205.74 3101,3244.93 C15.1 3160.44,3247.88 C16.1
NetC17_2: C17.2 U2.26 | length 76.6
  Top Layer w10: U2.26 3099.53,3080.47 C17.2
NetC18_2: C18.2 C19.2 U2.55 | length 144
  Top Layer w10: C19.2 C18.2 3099.53,3681.97 U2.55
NetC20_2: C20.2 U2.30 | length 77.1
  Top Layer w10: U2.30 3178.27,3081.73 C20.2
NetC21_1: C21.1 U2.28 | length 300.9
  Top Layer w10: U2.28 3139.41,3156.89 3139.41,3188.17 3149.32,3198.09 3226.9,3198.09 3312,3112.99 C21.1
NetC22_1: C22.1 R12.2 R13.1 | length 295.9
  Top Layer w10: R13.1 2580.36,2941.36 2606.64,2941.36 v1(2607,2941) ; R12.2 2580,3081.04 C22.1 2607.96,3109 v1(2607.96,3112.05)
  Bottom Layer w10: v1(2607,2941) 2607.48,2941.48 2607.48,3111.57 v1(2607.96,3112.05)
NetC22_2: C22.2 C23.2 C24.2 C25.2 R11.1 U2.17 | length 715.7
  Top Layer w10: C22.2 2637.77,3025.11 C23.2 C24.2 2758.44,3024.88 C25.2 2759,3028.39 2772.7,3042.09 2837.09,3042.09 U2.17@2921.85,3126.85 ; U2.17 2922.36,3126.85 2922.36,3102.64 3080,2945 R11.1
NetC23_1: C23.1 R14.2 R15.1 | length 305.7
  Top Layer w10: R15.1 2638.86,2941.86 2666.14,2941.86 v1(2667,2941) ; C23.1@2638,3078.7 2638,3082.95 2665.52,3110.48 2665.52,3113.52 v1(2667,3115) ; C23.1 2639,3081 R14.2
  Bottom Layer w10: v1(2667,2941) v1(2667,3115)
NetC24_1: C24.1 R16.2 R17.1 | length 301.3
  Top Layer w10: R17.1 v1(2727,2942) ; R16.2 C24.1 2698,3082.95 2727,3111.95 v1(2727,3114)
  Bottom Layer w10: v1(2727,2942) v1(2727,3114)
NetC25_1: C25.1 R18.2 R19.1 | length 303.7
  Top Layer w10: R18.2 2758,3081.56 C25.1 2759,3083.51 2789,3113.51 v1(2789,3114) ; R19.1 v1(2790,2941)
  Bottom Layer w10: v1(2789,3114) 2789.5,3113.5 2789.5,2941.5 v1(2790,2941)
NetC26_1: C26.1 U2.60 | length 92.3
  Top Layer w10: C26.1 2970,3679.49 2993.09,3656.4 2994.03,3656.4 3001.1,3649.33 U2.60
NetF1_1: F1.1 J1.A4_B9 J1.B4_A9 | length 391.9
  Top Layer w10: J1.B4_A9 2100.5,3339.86 2052.06,3339.86 2040.14,3351.77 2040.14,3500.14 2057.52,3517.52 2098.19,3517.52 J1.A4_B9 2201.02,3524.33 F1.1
NetJ1_A5: J1.A5 R1.1 | length 85.4
  Top Layer w10: v1(2060,3480) 2060.47,3479.53 2104.53,3479.53 J1.A5
  Bottom Layer w10: R1.1 v1(2060,3480)
NetJ1_A6: J1.A6 J1.B6 U3.1 | length 206.7
  Top Layer w10: J1.B6 2155.08,3400.31 2207.6,3347.8 U3.1 ; J1.A6 2105.91,3438.78 2130.32,3438.78 2138.64,3430.46 2138.64,3409.54 2130.32,3401.22
NetJ1_A7: J1.A7 J1.B7 U3.3 | length 331.7
  Top Layer w10: J1.A7 2104.09,3420.91 2079.68,3420.91 2078.7,3421.89 2071.36,3429.22 2071.36,3450.15 2079.68,3458.46 2104.09,3458.46 J1.B7 2105.91,3458.46 2134.25,3458.46 2222.31,3370.41 2259.79,3370.41 2282.4,3347.8 U3.3
NetJ1_B5: J1.B5 R2.1 | length 87.7
  Top Layer w10: v1(2060,3360) 2060.47,3360.47 2104.53,3360.47 J1.B5
  Bottom Layer w10: R2.1 v1(2060,3360)
NetJ2_1: J2.1 U2.34 | length 498.5
  Top Layer w10: U2.34 3294.13,3251.54 3325.42,3251.54 3342.52,3234.43 3342.52,3212.48 v1(3344,3211) ; J2.1 3589.2,3047.88 3619.88,3047.88 v1(3635,3063)
  Layer 2 w10: v1(3344,3211) 3344,3208.91 3347.86,3205.05 3347.86,3204.06 3488.92,3063 v1(3635,3063)
NetJ2_3: J2.3 U2.43 | length 628.3
  Top Layer w10: U2.43 3350.86,3429.21 3365.07,3415 3440,3415 v1(3440,3415.86) ; J2.3 3590.41,3128 v1(3651,3128)
  Layer 2 w10: v1(3440,3415.86) 3440,3349.92 3440,3295.43 3570.43,3165 3614,3165 v1(3651,3128)
NetJ2_5: J2.5 U2.40 | length 556.9
  Top Layer w10: U2.40 3355.72,3370.16 3362.91,3362.96 v1(3471,3363) v1(3471,3363) ; J2.5 3581.83,3235 3666.91,3235 3669.91,3238 v1(3672,3238)
  Layer 2 w10: v1(3471,3363) 3472,3364 3597,3364 3672,3289 v1(3672,3238)
NetJ2_8: J2.8 R6.2 U2.35 | length 731.4
  Top Layer w10: v1(3238.24,3287.43) 3238.24,3285.34 3250.95,3272.63 3250.95,3272.24 3293.11,3272.24 3294.13,3271.22 3331.06,3271.22 R6.2 ; J2.8 3587.12,3390.29 3623.29,3390.29 v1(3647,3414)
  Bottom Layer w10: v1(3238.24,3287.43) 3239.71,3288.89 3239.71,3299.71 3380,3440 3621,3440 v1(3647,3414)
NetJ2_9: J2.9 R8.2 U2.36 | length 704
  Top Layer w10: v1(3240,3340) 3240,3313.75 3261.83,3291.93 3293.11,3291.93 U2.36 3348.87,3291.42 R8.2 ; J2.9 3589.32,3441.7 3622.7,3441.7 v1(3641,3460)
  Bottom Layer w10: v1(3240,3340) 3360,3460 v1(3641,3460)
NetJ2_10: J2.10 U2.39 | length 394
  Top Layer w10: U2.39 3349.4,3350.47 3356.77,3343.1 3503.1,3343.1 3535,3375 3535,3454.09 3563.15,3482.24 J2.10
NetJ2_11: J2.11 U2.38 | length 581.4
  Top Layer w10: U2.38 3346.46,3330.79 3350.15,3327.1 3511.65,3327.1 3513.07,3328.52 3518.52,3328.52 v1(3520,3330) ; J2.11 3598.15,3531.46 3638.52,3491.08 3638.52,3486.48 v1(3640,3485)
  Bottom Layer w10: v1(3520,3330) 3591.08,3330 3666.86,3405.77 3666.86,3462.23 3649.23,3479.86 3647.23,3479.86 3642.09,3485 v1(3640,3485)
NetJ2_12: J2.12 U2.47 | length 323
  Top Layer w10: U2.47 3337.95,3507.95 3353.46,3523.46 3353.46,3533.38 3400.74,3580.67 J2.12
NetJ3_1: J3.1 R13.2 | length 216.3
  Top Layer w10: J3.1 R13.2
NetJ3_2: J3.2 R15.2 | length 234.7
  Top Layer w10: R15.2 2638,2732 J3.2
NetJ3_3: J3.3 R17.2 | length 250.9
  Top Layer w10: R17.2 2697,2773 J3.3
NetJ3_4: J3.4 R19.2 | length 265.7
  Top Layer w10: R19.2 2759,2811 J3.4
NetJ3_5: J3.5 R29.2 | length 190.1
  Top Layer w10: R29.2 2955.51,2724.86 2980,2700.38 J3.5
NetJ3_6: J3.6 R11.2 | length 167.3
  Top Layer w10: J3.6 R11.2
NetJ4_3: J4.3 U3.4 | length 781.3
  Top Layer w10: v1(2195,2800) 2195.28,2799.72 2195.28,2689.83 J4.3 ; v1(2280,3390) 2281.2,3391.2 2281.2,3433.21 U3.4
  Bottom Layer w10: v1(2195,2800) 2280,2885 v1(2280,3390)
NetJ4_4: J4.4 U3.6 | length 877.6
  Top Layer w10: v1(2095,2800) 2095.28,2799.72 2095.28,2689.83 J4.4 ; U3.6 2207.6,3422.2 2238.06,3391.74 2243.52,3391.74 v1(2245,3390.27)
  Bottom Layer w10: v1(2095,2800) 2162,2800 2260,2898 2260,3375.27 v1(2245,3390.27)
NetR3_1: R3.1 U2.42 | length 89.5
  Top Layer w10: U2.42 3294.13,3409.02 3328.36,3409.02 3347.37,3390 R3.1
NetR4_1: R4.1 U2.44 | length 84.5
  Top Layer w10: U2.44 3368.39,3448.9 R4.1
NetR5_1: R5.1 U2.45 | length 86.4
  Top Layer w10: U2.45 3363.87,3468.58 R5.1
NetR7_1: R7.1 U2.46 | length 94
  Top Layer w10: U2.46 3345.55,3488.27 R7.1
NetR9_2: R9.2 U2.37 | length 85
  Top Layer w10: U2.37 3367.18,3311.1 R9.2
NetR10_2: R10.2 U2.52 | length 64.1
  Top Layer w10: U2.52 R10.2@3158.58,3667.7
NetR12_1: R12.1 U2.10 | length 341.7
  Top Layer w10: R12.1 2761.76,3350.47 U2.10
NetR14_1: R14.1 U2.12 | length 266.4
  Top Layer w10: R14.1 2781.39,3311.1 U2.12
NetR16_1: R16.1 U2.14 | length 191
  Top Layer w10: R16.1 2801.02,3271.73 U2.14
NetR18_1: R18.1 U2.16 | length 114.7
  Top Layer w10: R18.1 2820.67,3231.67 2820.67,3231.85 2821.18,3232.36 U2.16
pads on no net: J1. J1.A8 J1.B8 U2.1 U2.2 U2.3 U2.4 U2.5 U2.6 U2.7 U2.8 U2.9 U2.11 U2.13 U2.15 U2.18 U2.27 U2.29 U2.62 U2.64

## Polygon pours and split planes (outlines as drawn)
GND on Layer 1 "GND_L02_P001" (solid, pour order 1): 1815,3840 1815,2625 3785,2625 3785,3840

## Silkscreen, mask and mechanical layers (free items; w line width, h text height)
Top Overlay:
  text "CORTEX DYNAMATICS / EEG ACQUISITION BOARD / REV B1" at 1900,2925 h60
Mechanical 1:
  lines w5: 1815,2625 3785,2625 3785,3840 1815,3840 1815,3100 1815,2625

## Text inside footprints (layer, text, board x,y; h text height)
J1: Mechanical 13 "PCB EDGE" at 1819.37,3217.24 h19.68 r270